# Altium PCB NB3000XN.PcbDoc (part 33 of 71)
Units mil, origin at the board's own origin, x right, y up, seen from the top; angles counter-clockwise.
Board outline 9527.56 x 6929.77 mil, 6 copper layers (Top Layer, GND+SHIELD, MidLayer1, MidLayer2, P2 - 3V3+5V0, Bottom Layer), stack 62.375 mil thick; 832 components, 1027 nets, 4655 pads, 4981 vias.
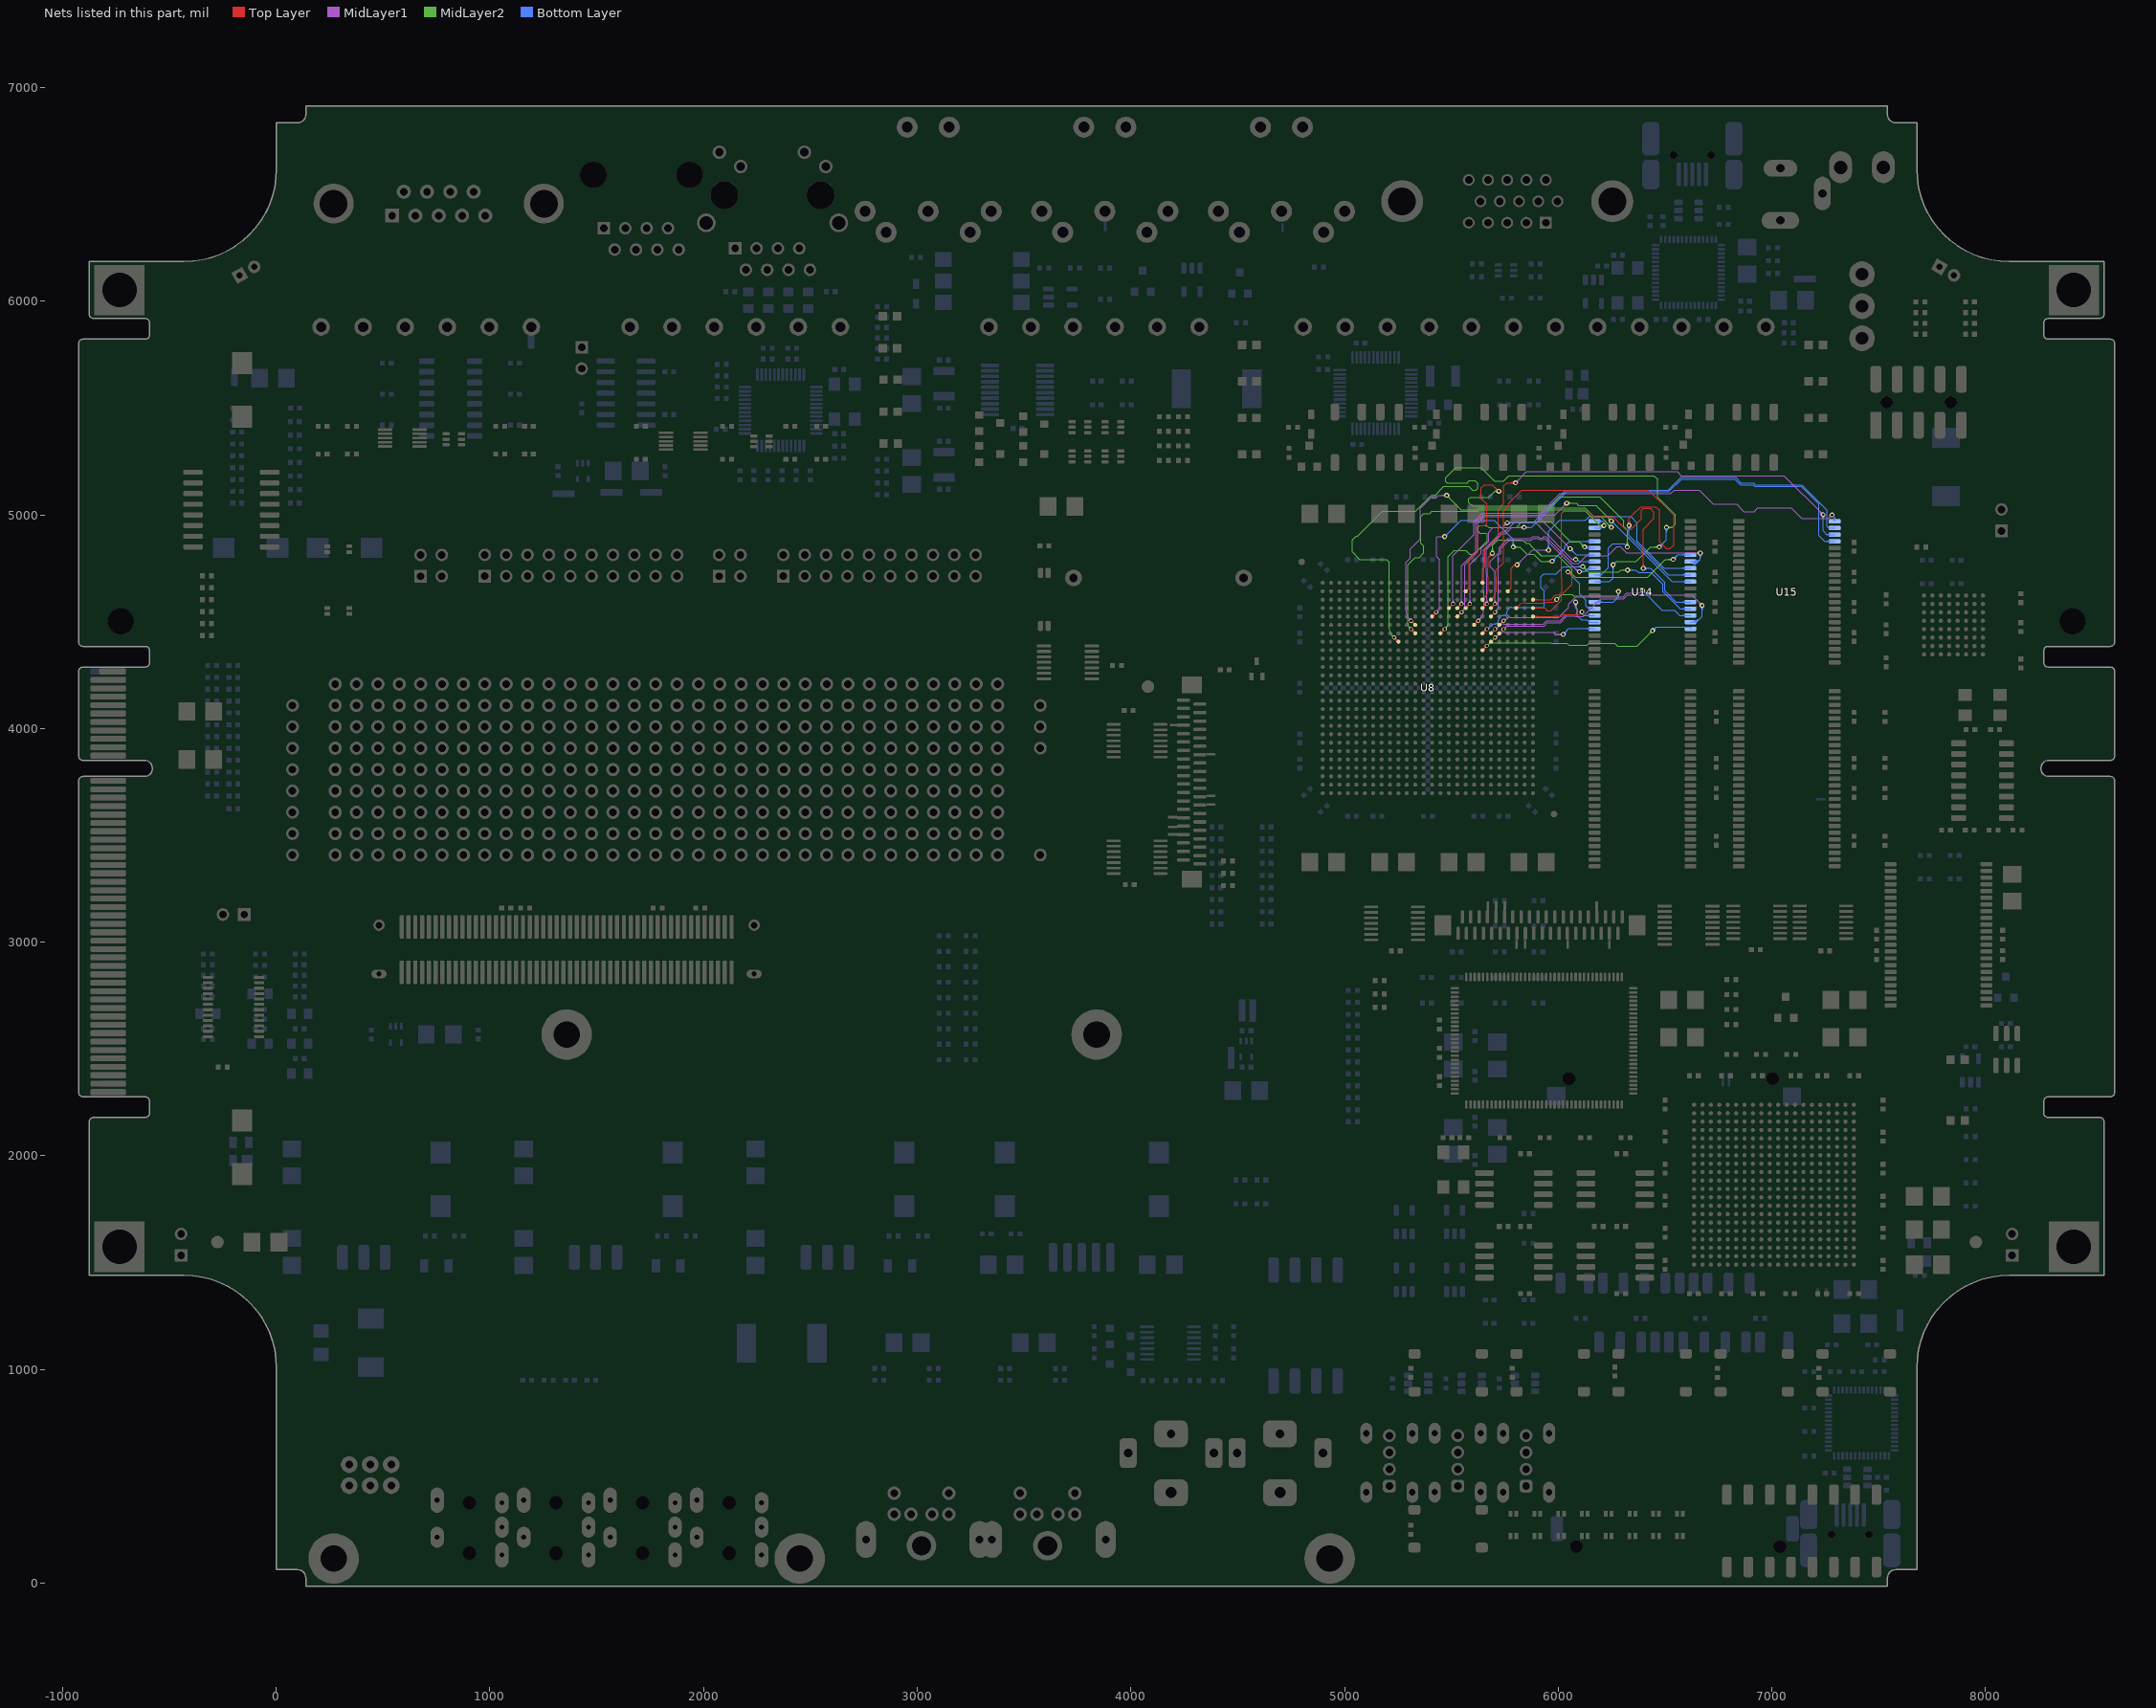
[diagram p37: the nets of this part, all layers, seen from the top]

## Via types
v1: diameter 23, hole 11.81, Top Layer to Bottom Layer, 3672 vias
v2: diameter 26, hole 11.81, Top Layer to Bottom Layer, 461 vias
v3: diameter 19, hole 11.81, Top Layer to Bottom Layer, tented both sides, 396 vias
v4: diameter 23.62, hole 11.81, Top Layer to Bottom Layer, 288 vias
v5: diameter 20, hole 11.81, Top Layer to Bottom Layer, 91 vias
v6: diameter 23, hole 11.81, Top Layer to Bottom Layer, tented both sides, 50 vias
v7: diameter 31, hole 11.81, Top Layer to Bottom Layer, 15 vias
v8: diameter 27.56, hole 11.81, Top Layer to Bottom Layer, tented both sides, 4 vias
v9: diameter 29, hole 11.81, Top Layer to Bottom Layer, 3 vias
v10: diameter 21, hole 11.81, Top Layer to Bottom Layer, 1 vias

## Nets (pads, with @x,y where several pads share a name; then routed paths per layer and width w, separated by ;. In a path a pad name is that pad's centre, name@x,y a point inside that pad or via, vN(x,y) a via of type N, cw(c..) or ccw(c..) an arc to the next point about the centre after c; other vN are vias at no path point) (continued)
DB_SRAM1.A16: U8.G12 U14.43 | length 1799.9
  Top Layer w4: v3(5311.26,4465.59) U8.G12@5330.94,4445.91 ; U8.G12@5323.44,4445.91 ccw(c5305.34,4445.91) 5318.14,4458.71 ccw(c5330.94,4471.51) U8.G12@5330.94,4453.41 ; U8.G12@5323.6,4445.91 ccw(c5305.88,4445.91) 5318.41,4458.44 ccw(c5330.94,4470.97) U8.G12@5330.94,4453.25 ; 5324.06,4452.79 cw(c5336.87,4465.59) 5318.76,4465.59 ccw(c5336.87,4465.59) 5324.06,4452.79 ; 5324.06,4452.79 ccw(c5311.26,4439.98) 5311.26,4458.09 cw(c5311.26,4439.98) 5324.06,4452.79
  MidLayer2 w4: 5295.75,4503.03 5295.75,4489.1 ; 5295.75,4699.16 5295.75,4640.9 ; 5299.87,4479.17 cw(c5309.8,4489.1) 5295.75,4489.1 ; v3@5303.79,4466.24 ccw(c5285.75,4467.82) 5299.62,4479.46 ccw(c5313.49,4491.1) v3@5311.91,4473.06 ; v1@6206.51,4944.45 ccw(c6195.52,4936.45) 6195.52,4950.04 ; v1@6206.51,4955.63 cw(c6195.52,4963.63) 6195.52,4950.04 ; v1(6214.19,4950.04) 6195.52,4950.04 ; 5295.75,4489.1 5295.75,4582.64 5295.75,4640.9 ; 5295.75,4640.9 5295.75,4710 5295.75,4720 5295.75,4766.97 5330,4801.22 5350.04,4801.22 5370.52,4821.71 5370.52,4854.37 5356.86,4868.04 5356.86,4993.04 5370.19,5006.37 5399.19,5006.37 5409.52,5016.71 5625.29,5016.71 5632.78,5024.2 6121.36,5024.2 6195.52,4950.04
  Bottom Layer w4: U14.43@6170.59,4939.21 6203.36,4939.21 ; U14.43@6194.74,4934.68 cw(c6203.36,4928.75) 6203.36,4939.21 ; U14.43@6194.74,4943.74 ccw(c6203.36,4949.67) 6203.36,4939.21 ; v1(6214.19,4950.04) 6203.36,4939.21
DB_SRAM1.A17: U8.F12 U14.44 | length 2061.9
  Top Layer w4: v3(5311.26,4504.96) U8.F12@5330.94,4485.28 ; U8.F12@5323.44,4485.28 ccw(c5305.34,4485.28) 5318.14,4498.08 ccw(c5330.94,4510.88) U8.F12@5330.94,4492.78 ; U8.F12@5323.6,4485.28 ccw(c5305.88,4485.28) 5318.41,4497.81 ccw(c5330.94,4510.34) U8.F12@5330.94,4492.62 ; 5324.06,4492.16 cw(c5336.87,4504.96) 5318.76,4504.96 ccw(c5336.87,4504.96) 5324.06,4492.16 ; 5324.06,4492.16 ccw(c5311.26,4479.35) 5311.26,4497.46 cw(c5311.26,4479.35) 5324.06,4492.16
  MidLayer1 w4: 5287.4,4581.77 5287.4,4567.84 ; v3@5303.79,4505.61 ccw(c5285.75,4507.19) 5299.62,4518.83 ; v3@5311.91,4512.43 cw(c5313.49,4530.47) 5299.62,4518.83 ; v1@5471.47,5084.99 ccw(c5455.26,5068.77) 5455.26,5091.71 ccw(c5455.26,5114.64) v1@5471.47,5098.43 ; v1@5474.3,5087.82 ccw(c5464.91,5078.43) 5464.91,5091.71 ccw(c5464.91,5104.99) v1@5474.3,5095.6 ; v1(5478.19,5091.71) 5438.33,5091.71 5430,5083.37 5406.52,5083.37 5354.86,5031.71 5354.86,4888.04 5306.86,4840.04 5306.86,4797.02 5287.4,4777.56 5287.4,4720 5287.4,4710 5287.4,4661.38 5287.4,4641.96 5287.4,4567.84 ; 5287.4,4567.84 5287.4,4548.34 ccw(c5329.13,4548.34) 5299.62,4518.83
  MidLayer2 w4: v1@5478.19,5082.21 cw(c5478.19,5059.27) 5494.41,5075.49 cw(c5510.63,5091.71) v1@5487.69,5091.71 ; v1@5478.19,5086.21 cw(c5478.19,5072.93) 5487.58,5082.32 cw(c5496.97,5091.71) v1@5483.69,5091.71 ; v1(5478.19,5091.71) 5544.86,5025.04 5622.31,5025.04 5629.47,5032.2 6124.69,5032.2 6165.19,4991.71 6198.52,4991.71 v1(6248.52,4941.71) ; v1@6239.02,4941.71 ccw(c6216.09,4941.71) 6232.31,4957.93 ccw(c6248.52,4974.14) v1@6248.52,4951.21 ; v1@6243.02,4941.71 ccw(c6229.75,4941.71) 6239.14,4951.1 ccw(c6248.52,4960.49) v1@6248.52,4947.21
  Bottom Layer w4: U14.44@6170.59,4970.71 6219.53,4970.71 v1(6248.52,4941.71) ; U14.44@6193.81,4965.05 cw(c6207.46,4951.4) 6207.46,4970.71 cw(c6207.47,4990.02) U14.44@6193.81,4976.36 ; v1@6239.02,4941.71 ccw(c6216.09,4941.71) 6232.31,4957.93 ccw(c6248.52,4974.14) v1@6248.52,4951.21 ; v1@6243.02,4941.71 ccw(c6229.75,4941.71) 6239.14,4951.1 ccw(c6248.52,4960.49) v1@6248.52,4947.21
DB_SRAM1.A18: U8.H21 U14.28 | length 811.3
  Top Layer w4: U8.H21@5685.28,4406.54 v3(5704.96,4426.22) ; U8.H21@5685.28,4413.88 ccw(c5685.28,4431.6) 5697.81,4419.07 ccw(c5710.34,4406.54) U8.H21@5692.62,4406.54 ; U8.H21@5685.28,4414.04 ccw(c5685.28,4432.14) 5698.08,4419.34 ccw(c5710.88,4406.54) U8.H21@5692.78,4406.54 ; 5692.16,4413.42 cw(c5704.96,4400.61) 5704.96,4418.72 ccw(c5704.96,4400.61) 5692.16,4413.42 ; 5692.16,4413.42 ccw(c5679.35,4426.22) 5697.46,4426.22 cw(c5679.35,4426.22) 5692.16,4413.42
  MidLayer1 w4: v3@5705.61,4433.69 ccw(c5707.19,4451.73) 5718.83,4437.86 ; v3@5712.43,4425.57 cw(c5730.47,4423.99) 5718.83,4437.86 ; 5781.77,4450.08 5767.84,4450.08 ; 5923.52,4450.04 5980,4450.04 5989.33,4440.71 v1(6023.52,4440.71) ; 5923.52,4450.08 5924.74,4450.08 5920,4450.08 5910,4450.08 5861.38,4450.08 5841.96,4450.08 5767.84,4450.08 ; v1@6016.81,4433.99 ccw(c6000.59,4417.77) 6000.59,4440.71 ccw(c6000.59,4463.64) v1@6016.81,4447.43 ; v1@6019.64,4436.82 ccw(c6010.25,4427.43) 6010.25,4440.71 ccw(c6010.25,4453.99) v1@6019.64,4444.6 ; 5718.83,4437.86 cw(c5748.34,4408.35) 5748.34,4450.08 5767.84,4450.08
  Bottom Layer w4: v1(6023.52,4440.71) 6023.52,4441.71 6049.52,4467.71 6164.52,4467.71 6165.19,4467.04 6165.19,4466.77 U14.28@6170.59,4466.77 ; v1@6023.52,4446.21 ccw(c6023.52,4457.07) 6031.21,4449.39 ; v1@6023.52,4450.21 ccw(c6023.52,4470.73) 6038.03,4456.22 ; v1@6029.02,4440.71 cw(c6044.72,4440.71) 6033.62,4451.8 ; v1@6033.02,4440.71 cw(c6058.37,4440.71) 6040.45,4458.63 ; 6131.46,4467.71 cw(c6131.46,4445.19) U14.28@6147.37,4461.11 ; 6135.98,4467.71 ccw(c6135.98,4483.82) U14.28@6147.37,4472.43 ; 6141.11,4467.71 cw(c6141.11,4454.85) U14.28@6150.2,4463.94
DB_SRAM1.D0: U8.D21 U14.7 | length 1913.9
  Top Layer w4: U8.D21@5685.28,4564.02 v3(5704.96,4583.7) ; U8.D21@5685.28,4571.36 ccw(c5685.28,4589.08) 5697.81,4576.55 ccw(c5710.34,4564.02) U8.D21@5692.62,4564.02 ; U8.D21@5685.28,4571.52 ccw(c5685.28,4589.62) 5698.08,4576.82 ccw(c5710.88,4564.02) U8.D21@5692.78,4564.02 ; 5692.16,4570.9 cw(c5704.96,4558.09) 5704.96,4576.2 ccw(c5704.96,4558.09) 5692.16,4570.9 ; 5692.16,4570.9 ccw(c5679.35,4583.7) 5697.46,4583.7 cw(c5679.35,4583.7) 5692.16,4570.9
  MidLayer1 w4: v3@5699.77,4588.89 ccw(c5687.23,4601.43) 5704.96,4601.43 ccw(c5722.69,4601.43) v3@5710.15,4588.89 ; v3(5704.96,4583.7) 5704.96,4661.38 5704.96,4710 5704.96,4720 5704.96,4733.27 5680.86,4757.37 5680.86,4782.37 5723.52,4825.04 5723.52,4847.04 5765.19,4888.71 5872.19,4888.71 5881.86,4898.37 5906.88,4898.37 5912.75,4892.5 5927.25,4892.5 5933.12,4898.37 5941.86,4898.37 6066.19,4774.04 6096.86,4774.04 6131.19,4808.37 6231.86,4808.37 6274.36,4850.87 6290.36,4850.87 6319.52,4821.71 v1(6665.19,4821.71) ; v1@6658.47,4814.99 ccw(c6642.26,4798.77) 6642.26,4821.71 ccw(c6642.26,4844.64) v1@6658.47,4828.43 ; v1@6661.3,4817.82 ccw(c6651.91,4808.43) 6651.91,4821.71 ccw(c6651.91,4834.99) v1@6661.3,4825.6 ; 5704.96,4601.81 cw(c5686.85,4601.81) 5699.66,4589 ccw(c5686.85,4601.81) 5704.96,4601.81 ; 5704.96,4601.81 ccw(c5723.07,4601.81) 5710.26,4589 cw(c5723.07,4601.81) 5704.96,4601.81
  Bottom Layer w4: U14.7@6619.41,4781.73 U14.7@6636.96,4781.73 ; 6630.88,4771.39 ccw(c6637.58,4782.77) 6646.92,4773.43 ; U14.7@6632.91,4774.84 ccw(c6640.29,4787.37) 6650.57,4777.09 ; U14.7@6634.94,4778.28 ccw(c6642.99,4791.97) 6654.23,4780.74 ; U14.7@6639,4785.18 ccw(c6648.41,4801.18) 6661.54,4788.05 ; U14.7@6641.02,4788.63 ccw(c6651.12,4805.78) 6665.19,4791.71 ; 6657.88,4784.4 cw(c6645.7,4796.58) U14.7@6636.97,4781.73 ; v1@6658.47,4814.99 cw(c6642.26,4798.77) 6665.19,4798.77 cw(c6688.13,4798.77) v1@6671.91,4814.99 ; v1@6661.3,4817.82 cw(c6651.91,4808.43) 6665.19,4808.43 cw(c6678.47,4808.43) v1@6669.08,4817.82 ; v1(6665.19,4821.71) 6665.19,4791.71 ; U14.7@6636.96,4781.73 6636.96,4775.04 6648.52,4775.04 6665.19,4791.71
DB_SRAM1.D1: U8.B23 U14.8 | length 1596.8
  Top Layer w4: 5780.47,4750.47 cw(c5806.45,4724.49) v1@5807.67,4761.21 ; 5786.99,4756.99 cw(c5806.87,4737.11) v1@5807.81,4765.21 ; 5793.51,4763.51 cw(c5807.29,4749.72) v1@5807.94,4769.21 ; v1(5807.86,4766.71) 5796.71,4766.71 5779.52,4749.52 5779.52,4720 5779.52,4710 5779.52,4662.47 ; 5776.55,4655.29 ccw(c5769.37,4662.47) 5779.52,4662.47 ; 5776.55,4655.29 ccw(c5769.37,4662.47) 5779.52,4662.47 ; 5776.55,4655.29 cw(c5764.02,4667.83) 5764.02,4650.1 ccw(c5764.02,4667.83) 5776.55,4655.29 ; 5776.55,4655.29 ccw(c5789.08,4642.76) 5771.36,4642.76 cw(c5789.08,4642.76) 5776.55,4655.29
  MidLayer1 w4: v1(5807.86,4766.71) 5856.15,4815 5860,4815 5880,4835 v1(5955,4835) 5955,4835.23 v1@5948.52,4841.71 ; v1@5807.86,4772.21 ccw(c5807.86,4785.49) 5817.25,4776.1 ccw(c5826.64,4766.71) v1@5813.36,4766.71 ; v1@5807.86,4776.21 ccw(c5807.86,4799.14) 5824.07,4782.93 ccw(c5840.29,4766.71) v1@5817.36,4766.71 ; v1@5948.28,4828.28 ccw(c5932.06,4812.06) 5932.06,4835 ccw(c5932.06,4857.93) v1@5948.28,4841.72 ; v1@5951.11,4831.11 ccw(c5941.72,4821.72) 5941.72,4835 ccw(c5941.72,4848.28) v1@5951.11,4838.89
  Bottom Layer w4: v1@5948.28,4841.72 ccw(c5932.06,4857.93) 5955,4857.93 ccw(c5977.93,4857.93) v1@5961.72,4841.72 ; v1@5948.52,4841.48 v1(5955,4835) 5955,4923.18 5996.38,4964.57 ; v1@5951.11,4838.89 ccw(c5941.72,4848.28) 5955,4848.28 ccw(c5968.28,4848.28) v1@5958.89,4838.89 ; 6001.11,4969.29 5996.38,4964.57 ; 6340.52,4991.71 6340,4991.71 ; 6506.52,4750.37 6506.52,4750.23 ; U14.8@6596.19,4744.58 ccw(c6582.54,4730.92) 6582.54,4750.23 ccw(c6582.54,4769.55) U14.8@6596.19,4755.89 ; U14.8@6619.41,4750.23 6506.52,4750.23 ; 5996.38,4964.57 6006.86,4975.04 6128.19,4975.04 6144.86,4991.71 6340,4991.71 ; 6340,4991.71 6370,4961.71 6370,4875.91 6495.67,4750.23 6506.52,4750.23
DB_SRAM1.D2: U8.C21 U14.9 | length 2701.3
  Top Layer w4: 5743.52,4821.71 5743.52,4822 ; v1@6325.14,4957.09 ccw(c6308.92,4973.31) 6331.86,4973.31 ccw(c6354.79,4973.31) v1@6338.57,4957.09 ; v1@6327.97,4954.26 ccw(c6318.58,4963.65) 6331.86,4963.65 ccw(c6345.14,4963.65) v1@6335.75,4954.26 ; v1(6331.86,4950.37) 6331.86,4983.37 6354.52,5006.04 6386.52,5038.04 6456.86,5038.04 6473.52,5021.37 6473.52,4875.04 6506.86,4841.71 6524.86,4841.71 6541.52,4858.37 6541.52,4998.71 6423.52,5116.71 5829.86,5116.71 5769,5055.85 5769,5042.24 5743.52,5016.77 5743.52,4822 ; 5697.81,4615.92 ccw(c5670.46,4643.27) 5709.14,4643.27 ; 5697.81,4615.92 ccw(c5670.46,4643.27) 5709.14,4643.27 ; 5697.81,4615.92 ccw(c5710.34,4603.39) 5692.62,4603.39 cw(c5710.34,4603.39) 5697.81,4615.92 ; 5697.81,4615.92 cw(c5685.28,4628.45) 5685.28,4610.73 ccw(c5685.28,4628.45) 5697.81,4615.92 ; 5709.14,4643.27 5709.14,4710 5709.14,4720 5709.14,4724.74 5709.14,4741.01 5743.52,4775.39 5743.52,4822
  Bottom Layer w4: v1@6325.14,4943.66 cw(c6308.92,4927.44) 6331.86,4927.44 cw(c6354.79,4927.44) v1@6338.57,4943.66 ; v1@6327.97,4946.49 cw(c6318.58,4937.1) 6331.86,4937.1 cw(c6345.14,4937.1) v1@6335.75,4946.49 ; v1(6331.86,4950.37) 6331.86,4902.74 6475.23,4759.36 6515.86,4718.74 ; 6493.52,4741.07 6515.86,4718.74 ; 6515.86,4718.74 U14.9@6619.41,4718.74 6515.86,4718.74 ; 6582.54,4718.74 cw(c6582.54,4699.42) 6596.19,4713.08 ccw(c6582.54,4699.42) 6582.54,4718.74 ; 6582.54,4718.74 ccw(c6582.54,4738.05) 6596.19,4724.4 cw(c6582.54,4738.05) 6582.54,4718.74
DB_SRAM1.D3: U8.D17 U14.10 | length 2087.1
  Top Layer w4: U8.D17@5527.8,4564.02 v3(5547.48,4583.7) ; U8.D17@5527.8,4571.36 ccw(c5527.8,4589.08) 5540.33,4576.55 ccw(c5552.86,4564.02) U8.D17@5535.14,4564.02 ; U8.D17@5527.8,4571.52 ccw(c5527.8,4589.62) 5540.6,4576.82 ccw(c5553.4,4564.02) U8.D17@5535.3,4564.02 ; 5534.68,4570.9 cw(c5547.48,4558.09) 5547.48,4576.2 ccw(c5547.48,4558.09) 5534.68,4570.9 ; 5534.68,4570.9 ccw(c5521.87,4583.7) 5539.98,4583.7 cw(c5521.87,4583.7) 5534.68,4570.9
  MidLayer1 w4: v3@5542.29,4588.89 ccw(c5529.75,4601.43) 5547.48,4601.43 ccw(c5565.21,4601.43) v3@5552.67,4588.89 ; v3(5547.48,4583.7) 5547.48,4661.38 5547.48,4710 5547.48,4720 5547.48,4724.74 5547.48,4752.37 5547.48,4762.46 5615.02,4830 5615.02,4965.33 5649.74,5000.04 5985.04,5000.04 v1(6040,5055) ; v1@6030.5,5055 cw(c6007.56,5055) 6023.78,5038.78 cw(c6040,5022.56) v1@6040,5045.5 ; v1@6034.5,5055 cw(c6021.22,5055) 6030.61,5045.61 cw(c6040,5036.22) v1@6040,5049.5 ; 5547.48,4601.81 cw(c5529.37,4601.81) 5542.18,4589 ccw(c5529.37,4601.81) 5547.48,4601.81 ; 5547.48,4601.81 ccw(c5565.59,4601.81) 5552.78,4589 cw(c5565.59,4601.81) 5547.48,4601.81
  MidLayer2 w4: v1(6040,5055) 6084.37,5055 6095,5044.37 6175.86,5044.37 v1(6248.52,4971.71) ; v1@6043.89,5051.11 cw(c6053.28,5041.72) 6053.28,5055 cw(c6053.28,5068.28) v1@6043.89,5058.89 ; v1@6046.72,5048.28 cw(c6062.93,5032.06) 6062.93,5055 cw(c6062.93,5077.93) v1@6046.72,5061.72 ; v1@6239.02,4971.71 ccw(c6216.09,4971.71) 6232.31,4987.93 ccw(c6248.52,5004.14) v1@6248.52,4981.21 ; v1@6243.02,4971.71 ccw(c6229.75,4971.71) 6239.14,4981.1 ccw(c6248.52,4990.49) v1@6248.52,4977.21
  Bottom Layer w4: v1@6248.52,4962.21 cw(c6248.52,4939.27) 6264.74,4955.49 cw(c6280.96,4971.71) v1@6258.02,4971.71 ; v1@6248.52,4966.21 cw(c6248.52,4952.93) 6257.91,4962.32 cw(c6267.3,4971.71) v1@6254.02,4971.71 ; v1(6248.52,4971.71) 6465.19,4755.04 6532.99,4687.24 U14.10@6619.41,4687.24 ; U14.10@6596.19,4681.59 ccw(c6582.54,4667.93) 6582.54,4687.24 ccw(c6582.54,4706.56) U14.10@6596.19,4692.9
DB_SRAM1.D4: U8.C26 U14.13 | length 1855
  Top Layer w4: U8.C26@5882.13,4603.39 5910,4603.39 5920,4603.39 5924.74,4603.39 5965.87,4603.39 5987.52,4625.04 6003.19,4625.04 6018.19,4640.04 6018.19,4700.04 6015.19,4703.04 6015.19,5005.19 6027.04,5017.04 6139.67,5017.04 6165,4991.71 6255.52,4991.71 6315.19,4932.04 6340.19,4932.04 6390.19,4982.04 6390.19,5021.71 6398.52,5030.04 6431.86,5030.04 6448.52,5013.37 6448.52,4983.37 6398.52,4933.37 v1(6398.52,4750.04) ; U8.C26@5887.32,4598.19 cw(c5899.85,4585.66) 5899.85,4603.39 cw(c5899.85,4621.11) U8.C26@5887.32,4608.58 ; U8.C26@5887.43,4598.08 cw(c5900.23,4585.28) 5900.23,4603.39 cw(c5900.23,4621.49) U8.C26@5887.43,4608.69 ; v1@6391.81,4756.76 ccw(c6375.59,4772.98) 6398.52,4772.98 ccw(c6421.46,4772.98) v1@6405.24,4756.76 ; v1@6394.64,4753.93 ccw(c6385.25,4763.32) 6398.52,4763.32 ccw(c6411.8,4763.32) v1@6402.41,4753.93
  Bottom Layer w4: v1(6398.52,4750.04) 6431.86,4750.04 6498.52,4683.37 6498.52,4644.69 6550.46,4592.75 U14.13@6619.41,4592.75 ; v1@6402.41,4746.15 cw(c6411.8,4736.76) 6411.8,4750.04 cw(c6411.8,4763.32) v1@6402.41,4753.93 ; v1@6405.24,4743.32 cw(c6421.46,4727.11) 6421.46,4750.04 cw(c6421.46,4772.98) v1@6405.24,4756.76 ; U14.13@6596.19,4587.1 ccw(c6582.54,4573.44) 6582.54,4592.75 ccw(c6582.54,4612.07) U14.13@6596.19,4598.41
DB_SRAM1.D5: U8.G20 U14.14 | length 1710.9
  Top Layer w4: U8.G20@5645.91,4445.91 v3(5665.59,4465.59) ; U8.G20@5645.91,4453.25 ccw(c5645.91,4470.97) 5658.44,4458.44 ccw(c5670.97,4445.91) U8.G20@5653.25,4445.91 ; U8.G20@5645.91,4453.41 ccw(c5645.91,4471.51) 5658.71,4458.71 ccw(c5671.51,4445.91) U8.G20@5653.41,4445.91 ; 5652.79,4452.79 cw(c5665.59,4439.98) 5665.59,4458.09 ccw(c5665.59,4439.98) 5652.79,4452.79 ; 5652.79,4452.79 ccw(c5639.98,4465.59) 5658.09,4465.59 cw(c5639.98,4465.59) 5652.79,4452.79
  MidLayer2 w4: v1@6115.19,4748.87 cw(c6115.19,4725.94) 6131.41,4742.16 cw(c6147.63,4758.37) v1@6124.69,4758.37 ; v1@6115.19,4752.87 cw(c6115.19,4739.6) 6124.58,4748.99 cw(c6133.97,4758.37) v1@6120.69,4758.37 ; v1(6115.19,4758.37) 6140.19,4733.37 6285,4733.37 6293.33,4741.71 v1(6325.19,4741.71) ; v1@6318.47,4734.99 ccw(c6302.26,4718.77) 6302.26,4741.71 ccw(c6302.26,4764.64) v1@6318.47,4748.43 ; v1@6321.3,4737.82 ccw(c6311.91,4728.43) 6311.91,4741.71 ccw(c6311.91,4754.99) v1@6321.3,4745.6
  Bottom Layer w4: v3@5666.89,4472.98 ccw(c5670.04,4490.81) 5680.42,4475.98 ; v3@5672.98,4464.29 cw(c5690.81,4461.14) 5680.42,4475.98 ; 5920,4658.43 5922.22,4656.22 ; v1@6108.47,4751.66 ccw(c6092.26,4735.44) 6092.26,4758.37 ccw(c6092.26,4781.31) v1@6108.47,4765.09 ; v1@6111.3,4754.49 ccw(c6101.91,4745.1) 6101.91,4758.37 ccw(c6101.91,4771.65) v1@6111.3,4762.26 ; v1(6115.19,4758.37) 6023.52,4758.37 5990.19,4725.04 5932.19,4725.04 5918.48,4711.33 5918.48,4659.96 5922.22,4656.22 ; v1(6325.19,4741.71) 6363.29,4741.71 6375,4730 6435.23,4730 6456.52,4708.71 6490.19,4675.04 6490.19,4641.71 6570.64,4561.26 U14.14@6619.41,4561.26 ; v1@6329.08,4737.82 cw(c6338.47,4728.43) 6338.47,4741.71 cw(c6338.47,4754.99) v1@6329.08,4745.6 ; v1@6331.91,4734.99 cw(c6348.13,4718.77) 6348.13,4741.71 cw(c6348.13,4764.64) v1@6331.91,4748.43 ; U14.14@6596.19,4555.6 ccw(c6582.54,4541.94) 6582.54,4561.26 ccw(c6582.54,4580.57) U14.14@6596.19,4566.92 ; 5680.42,4475.98 5688.15,4482.4 cw(c5704.96,4465.59) 5704.96,4489.36 ccw(c5704.96,4504.96) 5720.56,4504.96 cw(c5744.33,4504.96) 5744.33,4528.73 ccw(c5744.33,4544.33) 5759.93,4544.33 cw(c5783.7,4544.33) 5783.7,4568.1 5841.96,4568.1 5900.22,4568.1 5910,4568.1 5920,4568.1 5924.74,4568.1 5931.86,4568.1 5935,4571.24 5935,4643.43 5922.22,4656.22
DB_SRAM1.D6: U8.F22 U14.15 | length 1228.3
  Top Layer w4: U8.F22@5724.65,4485.28 v3(5744.33,4504.96) ; U8.F22@5724.65,4492.62 ccw(c5724.65,4510.34) 5737.18,4497.81 ccw(c5749.71,4485.28) U8.F22@5731.99,4485.28 ; U8.F22@5724.65,4492.78 ccw(c5724.65,4510.88) 5737.45,4498.08 ccw(c5750.25,4485.28) U8.F22@5732.15,4485.28 ; 5731.53,4492.16 cw(c5744.33,4479.35) 5744.33,4497.46 ccw(c5744.33,4479.35) 5731.53,4492.16 ; 5731.53,4492.16 ccw(c5718.72,4504.96) 5736.83,4504.96 cw(c5718.72,4504.96) 5731.53,4492.16
  MidLayer1 w4: v3@5745.63,4512.35 ccw(c5748.78,4530.18) 5759.16,4515.35 ccw(c5769.55,4500.51) v3@5751.72,4503.66 ; 5759.19,4515.38 cw(c5776.84,4487.34) 5777.01,4520.47 5861.38,4520.47 5910,4520.47 ; 5910,4520.54 5920,4520.54 6001.75,4520.54 6040.63,4559.42 6041.23,4559.42 6048.52,4566.71 6048.52,4583.37 6081.86,4616.71 6303.88,4616.71 6320.88,4633.71 6382.19,4633.71 v1(6395.19,4646.71)
  Bottom Layer w4: v1@6395.19,4637.21 cw(c6395.19,4614.27) 6411.41,4630.49 cw(c6427.63,4646.71) v1@6404.69,4646.71 ; v1@6395.19,4641.21 cw(c6395.19,4627.93) 6404.58,4637.32 cw(c6413.97,4646.71) v1@6400.69,4646.71 ; v1(6395.19,4646.71) 6486.9,4555 6544.53,4555 6569.76,4529.76 U14.15@6619.41,4529.76 ; U14.15@6596.19,4524.11 ccw(c6582.54,4510.45) 6582.54,4529.76 ccw(c6582.54,4549.08) U14.15@6596.19,4535.42
DB_SRAM1.D7: U8.G22 U14.16 | length 1487.7
  Top Layer w4: U8.G22@5724.65,4445.91 v3(5744.33,4465.59) ; U8.G22@5724.65,4453.25 ccw(c5724.65,4470.97) 5737.18,4458.44 ccw(c5749.71,4445.91) U8.G22@5731.99,4445.91 ; U8.G22@5724.65,4453.41 ccw(c5724.65,4471.51) 5737.45,4458.71 ccw(c5750.25,4445.91) U8.G22@5732.15,4445.91 ; 5731.53,4452.79 cw(c5744.33,4439.98) 5744.33,4458.09 ccw(c5744.33,4439.98) 5731.53,4452.79 ; 5731.53,4452.79 ccw(c5718.72,4465.59) 5736.83,4465.59 cw(c5718.72,4465.59) 5731.53,4452.79
  MidLayer1 w4: v3@5744.98,4473.06 ccw(c5746.56,4491.1) 5758.2,4477.23 ccw(c5769.84,4463.36) v3@5751.8,4464.94 ; 5757.91,4476.99 cw(c5767.84,4467.05) 5767.84,4481.1 5861.38,4481.1 5933.83,4481.1 5949.28,4496.54 6011.69,4496.54 6041.19,4526.04 6079.21,4526.04 6080.04,4525.21 6115.36,4525.21 6198.52,4608.37 6306.86,4608.37 6324.19,4625.71 6623.86,4625.71 v1(6673.52,4576.04) ; v1@6664.02,4576.04 ccw(c6641.09,4576.04) 6657.31,4592.26 ccw(c6673.52,4608.48) v1@6673.52,4585.54 ; v1@6668.02,4576.04 ccw(c6654.75,4576.04) 6664.14,4585.43 ccw(c6673.52,4594.82) v1@6673.52,4581.54
  Bottom Layer w4: U14.16@6619.41,4498.27 6623.52,4498.27 6623.52,4500.04 6648.52,4500.04 ; U14.16@6636.97,4498.27 ccw(c6636.97,4521.88) 6653.67,4505.18 ; U14.16@6636.97,4502.27 ccw(c6636.97,4535.54) 6660.5,4512.01 ; U14.16@6636.97,4506.27 ccw(c6636.97,4549.2) 6667.32,4518.84 ; U14.16@6643.65,4502.67 ccw(c6648.52,4505.88) 6648.52,4500.04 ; U14.16@6644.86,4496.94 cw(c6648.52,4496.32) 6648.52,4500.04 ; v1@6666.81,4569.32 cw(c6650.59,4553.11) 6673.52,4553.11 cw(c6696.46,4553.11) v1@6680.24,4569.32 ; v1@6669.64,4572.15 cw(c6660.25,4562.76) 6673.52,4562.76 cw(c6686.8,4562.76) v1@6677.41,4572.15 ; v1(6673.52,4576.04) 6673.52,4525.04 6648.52,4500.04
DB_SRAM1.D8: U8.G21 U14.29 | length 1019
  Top Layer w4: U8.G21@5685.28,4445.91 v3(5704.96,4465.59) ; U8.G21@5685.28,4453.25 ccw(c5685.28,4470.97) 5697.81,4458.44 ccw(c5710.34,4445.91) U8.G21@5692.62,4445.91 ; U8.G21@5685.28,4453.41 ccw(c5685.28,4471.51) 5698.08,4458.71 ccw(c5710.88,4445.91) U8.G21@5692.78,4445.91 ; 5692.16,4452.79 cw(c5704.96,4439.98) 5704.96,4458.09 ccw(c5704.96,4439.98) 5692.16,4452.79 ; 5692.16,4452.79 ccw(c5679.35,4465.59) 5697.46,4465.59 cw(c5679.35,4465.59) 5692.16,4452.79
  MidLayer1 w4: v3@5706.26,4472.98 ccw(c5709.41,4490.81) 5719.79,4475.98 ; v3@5712.35,4464.29 cw(c5730.18,4461.14) 5719.79,4475.98 ; 5781.77,4489.45 5767.84,4489.45 ; v1(6081.86,4591.71) 6081.86,4568.33 6090.19,4560 6090.19,4541.71 6082.52,4534.04 6037.88,4534.04 6008.38,4504.54 5945.02,4504.54 5929.94,4489.45 5920,4489.45 5910,4489.45 5861.38,4489.45 5841.96,4489.45 5767.84,4489.45 ; 5719.79,4475.98 5728.37,4483.06 cw(c5744.59,4465.68) 5744.42,4489.45 ; 5744.42,4489.45 cw(c5744.59,4465.68) 5744.59,4489.45 ; 5744.42,4489.45 5744.59,4489.45 ; 5744.59,4489.45 5767.84,4489.45 ; 6081.86,4568.77 cw(c6104.79,4568.77) 6088.57,4584.99 ccw(c6104.79,4568.77) 6081.86,4568.77 ; 6081.86,4568.77 ccw(c6058.92,4568.77) 6075.14,4584.99 cw(c6058.92,4568.77) 6081.86,4568.77 ; 6081.86,4578.43 cw(c6095.14,4578.43) 6085.75,4587.82 ccw(c6095.14,4578.43) 6081.86,4578.43 ; 6081.86,4578.43 ccw(c6068.58,4578.43) 6077.97,4587.82 cw(c6068.58,4578.43) 6081.86,4578.43
  Bottom Layer w4: v1@6075.14,4584.99 cw(c6058.92,4568.77) 6081.86,4568.77 cw(c6104.79,4568.77) v1@6088.57,4584.99 ; v1@6077.97,4587.82 cw(c6068.58,4578.43) 6081.86,4578.43 cw(c6095.14,4578.43) v1@6085.75,4587.82 ; v1(6081.86,4591.71) 6081.86,4563.33 6090.19,4555 6090.19,4526.71 6108.52,4508.37 6135,4508.37 6145.11,4498.27 U14.29@6150,4498.27 ; 6138.96,4504.41 ccw(c6143.43,4508.88) U14.29@6147.66,4504.2 ; 6141.93,4501.44 ccw(c6146.25,4505.76) U14.29@6150.35,4501.23 ; U14.29@6167.89,4498.27 U14.29@6150,4498.27 ; U14.29@6188.27,4498.27 U14.29@6150,4498.27
DB_SRAM1.D9: U8.E26 U14.30 | length 407.5
  Top Layer w4: U8.E26@5882.13,4524.65 5910,4524.65 5920,4524.65 6015,4524.65 6023.73,4533.37 6098.52,4533.37 v1(6111.19,4546.04) ; U8.E26@5887.32,4519.45 cw(c5899.85,4506.92) 5899.85,4524.65 cw(c5899.85,4542.37) U8.E26@5887.32,4529.84 ; U8.E26@5887.43,4519.34 cw(c5900.23,4506.54) 5900.23,4524.65 cw(c5900.23,4542.75) U8.E26@5887.43,4529.95
  Bottom Layer w4: v1(6111.19,4546.04) 6102.86,4546.04 6103.25,4545.65 6103.25,4545.43 6106.91,4541.76 6118.91,4529.76 U14.30@6170.59,4529.76 ; U14.30@6147.37,4524.11 ccw(c6133.72,4510.45) 6133.72,4529.76 ccw(c6133.72,4549.08) U14.30@6147.37,4535.42
DB_SRAM1.D10: U8.D26 U14.31 | length 771
  Top Layer w4: U8.D26@5882.13,4564.02 5910,4564.02 5920,4564.02 5924.74,4564.02 5936.99,4564.02 5948.96,4552.04 5967.19,4552.04 6015.19,4600.04 6015.19,4625.04 6065.19,4675.04 6065.19,4713.71 v1(6045.52,4733.37) ; U8.D26@5887.32,4558.82 cw(c5899.85,4546.29) 5899.85,4564.02 cw(c5899.85,4581.74) U8.D26@5887.32,4569.21 ; U8.D26@5887.43,4558.71 cw(c5900.23,4545.91) 5900.23,4564.02 cw(c5900.23,4582.12) U8.D26@5887.43,4569.32 ; v1@6045.52,4723.87 cw(c6045.52,4700.94) 6061.74,4717.16 cw(c6077.96,4733.37) v1@6055.02,4733.37 ; v1@6045.52,4727.87 cw(c6045.52,4714.6) 6054.91,4723.99 cw(c6064.3,4733.37) v1@6051.02,4733.37
  Bottom Layer w4: v1@6045.52,4723.87 cw(c6045.52,4700.94) 6061.74,4717.16 cw(c6077.96,4733.37) v1@6055.02,4733.37 ; v1@6045.52,4727.87 cw(c6045.52,4714.6) 6054.91,4723.99 cw(c6064.3,4733.37) v1@6051.02,4733.37 ; v1(6045.52,4733.37) 6100.86,4678.04 6100.86,4629.14 6130,4600 6130,4575 6143.74,4561.26 U14.31@6170.59,4561.26 ; 6134.65,4570.35 ccw(c6143.3,4579.01) U14.31@6149.19,4568.27 ; 6138.42,4566.58 ccw(c6145.97,4574.14) U14.31@6151.11,4564.77 ; 6142.19,4562.81 ccw(c6148.65,4569.26) U14.31@6153.03,4561.26
DB_SRAM1.D11: U8.D24 U14.32 | length 881.1
  Top Layer w4: v1(5992.86,4604.04) 5980.52,4591.71 5944.19,4591.71 5940.36,4587.88 5924.74,4587.88 5920,4587.88 5910,4587.88 5843.27,4587.88 ; 5815.92,4576.55 cw(c5843.27,4549.2) 5843.27,4587.88 ; 5815.92,4576.55 cw(c5843.27,4549.2) 5843.27,4587.88 ; 5815.92,4576.55 cw(c5803.39,4589.08) 5803.39,4571.36 ccw(c5803.39,4589.08) 5815.92,4576.55 ; 5815.92,4576.55 ccw(c5828.45,4564.02) 5810.73,4564.02 cw(c5828.45,4564.02) 5815.92,4576.55
  MidLayer2 w4: v1(5992.86,4604.04) 6015.86,4627.04 6065.19,4627.04 6070.52,4621.71 6277.52,4621.71 6281.86,4626.04 v1(6281.86,4641.71) ; v1@5992.86,4609.54 ccw(c5992.86,4622.82) 6002.25,4613.43 ccw(c6011.64,4604.04) v1@5998.36,4604.04 ; v1@5992.86,4613.54 ccw(c5992.86,4636.48) 6009.07,4620.26 ccw(c6025.29,4604.04) v1@6002.36,4604.04
  Bottom Layer w4: U14.32@6170.59,4592.75 6230.9,4592.75 6257.75,4592.75 6281.86,4616.86 v1(6281.86,4641.71) ; U14.32@6193.81,4587.1 cw(c6207.46,4573.44) 6207.46,4592.75 cw(c6207.46,4612.07) U14.32@6193.81,4598.41 ; v1@6275.14,4634.99 cw(c6258.92,4618.77) 6281.86,4618.77 cw(c6304.79,4618.77) v1@6288.57,4634.99 ; v1@6277.97,4637.82 cw(c6268.58,4628.43) 6281.86,4628.43 cw(c6295.14,4628.43) v1@6285.75,4637.82
DB_SRAM1.D12: U8.H10 U14.35 | length 3952.9
  Top Layer w4: v3(5232.52,4426.22) U8.H10@5252.2,4406.54 ; U8.H10@5244.7,4406.54 ccw(c5226.6,4406.54) 5239.4,4419.34 ccw(c5252.2,4432.14) U8.H10@5252.2,4414.04 ; U8.H10@5244.86,4406.54 ccw(c5227.14,4406.54) 5239.67,4419.07 ccw(c5252.2,4431.6) U8.H10@5252.2,4413.88 ; 5245.32,4413.42 cw(c5258.13,4426.22) 5240.02,4426.22 ccw(c5258.13,4426.22) 5245.32,4413.42 ; 5245.32,4413.42 ccw(c5232.52,4400.61) 5232.52,4418.72 cw(c5232.52,4400.61) 5245.32,4413.42
  MidLayer2 w4: 5208.66,4699.16 5208.66,4640.9 ; v3@5225.05,4426.87 ccw(c5207.01,4428.45) 5220.88,4440.09 ; v3@5233.17,4433.69 cw(c5234.75,4451.73) 5220.88,4440.09 ; v1(6256.86,4766.71) 6273.52,4783.37 6365.19,4783.37 6431.86,4850.04 v1(6473.52,4850.04) ; v1@6256.86,4772.21 ccw(c6256.86,4785.49) 6266.25,4776.1 ccw(c6275.64,4766.71) v1@6262.36,4766.71 ; v1@6256.86,4776.21 ccw(c6256.86,4799.14) 6273.07,4782.93 ccw(c6289.29,4766.71) v1@6266.36,4766.71 ; v1@6466.81,4843.32 ccw(c6450.59,4827.11) 6450.59,4850.04 ccw(c6450.59,4872.98) v1@6466.81,4856.76 ; v1@6469.64,4846.15 ccw(c6460.25,4836.76) 6460.25,4850.04 ccw(c6460.25,4863.32) v1@6469.64,4853.93 ; v1(6506.86,4941.71) 6533.86,4941.71 6548.52,4956.37 6548.52,5000.04 6465.19,5083.37 6465.19,5166.71 6448.52,5183.37 5768.86,5183.37 5743.86,5158.37 5702.56,5158.37 5639.56,5221.37 5519.86,5221.37 5473.52,5175.04 5473.52,5157.37 5480.86,5150.04 5573.52,5150.04 5583.48,5160 5610,5160 5623.52,5146.48 5623.52,5125.04 5615.19,5116.71 5598.52,5116.71 5581.86,5133.37 5465.19,5133.37 5423.52,5091.71 5406.86,5091.71 5332.15,5017 5178.31,5017 5061.69,4900.37 5054.52,4900.37 5036.19,4882.04 5036.19,4826.44 5070.59,4792.04 5195.21,4792.04 5208.66,4778.59 5208.66,4720 5208.66,4710 5208.66,4640.9 ; v1@6510.75,4937.82 cw(c6520.14,4928.43) 6520.14,4941.71 cw(c6520.14,4954.99) v1@6510.75,4945.6 ; v1@6513.57,4934.99 cw(c6529.79,4918.77) 6529.79,4941.71 cw(c6529.79,4964.64) v1@6513.57,4948.43 ; 5208.66,4640.9 5208.66,4582.64 5208.66,4563.22 5208.66,4489.1 5208.66,4469.6 ccw(c5250.39,4469.6) 5220.88,4440.09
  Bottom Layer w4: U14.35@6193.81,4681.59 cw(c6207.46,4667.93) 6207.46,4687.24 cw(c6207.46,4706.56) U14.35@6193.81,4692.9 ; v1@6250.14,4759.99 cw(c6233.92,4743.77) 6256.86,4743.77 cw(c6279.79,4743.77) v1@6263.57,4759.99 ; v1@6252.97,4762.82 cw(c6243.58,4753.43) 6256.86,4753.43 cw(c6270.14,4753.43) v1@6260.75,4762.82 ; v1(6256.86,4766.71) 6256.86,4704.1 6240,4687.24 U14.35@6171.47,4687.24 ; v1(6473.52,4850.04) 6506.86,4883.37 v1(6506.86,4941.71) ; v1@6473.52,4855.54 ccw(c6473.52,4868.82) 6482.91,4859.43 ccw(c6492.3,4850.04) v1@6479.02,4850.04 ; v1@6473.52,4859.54 ccw(c6473.52,4882.48) 6489.74,4866.26 ccw(c6505.96,4850.04) v1@6483.02,4850.04 ; v1@6500.14,4934.99 cw(c6483.92,4918.77) 6506.86,4918.77 cw(c6529.79,4918.77) v1@6513.57,4934.99 ; v1@6502.97,4937.82 cw(c6493.58,4928.43) 6506.86,4928.43 cw(c6520.14,4928.43) v1@6510.75,4937.82 ; U14.35@6171.47,4687.24 U14.35@6170.59,4687.24 U14.35@6171.47,4687.24
DB_SRAM1.D13: U8.B18 U14.36 | length 2184.8
  Top Layer w4: U8.B18@5567.17,4650.1 ccw(c5567.17,4667.83) 5579.7,4655.29 ; U8.B18@5574.51,4642.76 cw(c5592.23,4642.76) 5579.7,4655.29 ; v1@5712.69,5110.71 ccw(c5689.76,5110.71) 5705.97,5126.93 ccw(c5722.19,5143.14) v1@5722.19,5120.21 ; v1@5716.69,5110.71 ccw(c5703.41,5110.71) 5712.8,5120.1 ccw(c5722.19,5129.49) v1@5722.19,5116.21 ; v1(5722.19,5110.71) 5691.19,5141.71 5655.19,5141.71 5640.19,5126.71 5640.19,5075.04 5665.19,5050.04 5665.19,4959.71 5656.86,4951.37 5627.52,4951.37 5623.52,4947.37 5623.52,4829.37 5582.67,4788.52 5582.67,4724.74 5582.67,4720 5582.67,4710 5582.67,4662.47 cw(c5572.52,4662.47) 5579.7,4655.29
  MidLayer2 w4: v1@5714.51,5105.12 ccw(c5703.52,5097.12) 5703.52,5110.71 ; v1@5714.51,5116.3 cw(c5703.52,5124.29) 5703.52,5110.71 ; v1(5722.19,5110.71) 5703.52,5110.71 ; v1@6316.81,4856.76 ccw(c6300.59,4872.98) 6323.52,4872.98 ccw(c6346.46,4872.98) v1@6330.24,4856.76 ; v1@6319.64,4853.93 ccw(c6310.25,4863.32) 6323.52,4863.32 ccw(c6336.8,4863.32) v1@6327.41,4853.93 ; v1(6323.52,4850.04) 6323.52,4928.04 6305.77,4945.8 6305.77,4973.15 6195.21,5083.71 6007.19,5083.71 5965.19,5041.71 5598.52,5041.71 5581.86,5058.37 5581.86,5075.04 5590.19,5083.37 5676.19,5083.37 5703.52,5110.71
  Bottom Layer w4: U14.36@6170.59,4718.74 6200.55,4718.74 ; U14.36@6195.44,4715.44 cw(c6200.55,4713.12) 6200.55,4718.74 ; U14.36@6195.44,4722.04 ccw(c6200.55,4724.36) 6200.55,4718.74 ; v1(6323.52,4850.04) 6308.56,4865 6255,4865 6235,4845 6235,4753.18 6231.86,4750.04 6200.55,4718.74
DB_SRAM1.D14: U8.E21 U14.37 | length 1194
  Top Layer w4: U8.E21@5685.28,4524.65 v3(5704.96,4544.33) ; U8.E21@5685.28,4531.99 ccw(c5685.28,4549.71) 5697.81,4537.18 ccw(c5710.34,4524.65) U8.E21@5692.62,4524.65 ; U8.E21@5685.28,4532.15 ccw(c5685.28,4550.25) 5698.08,4537.45 ccw(c5710.88,4524.65) U8.E21@5692.78,4524.65 ; 5692.16,4531.53 cw(c5704.96,4518.72) 5704.96,4536.83 ccw(c5704.96,4518.72) 5692.16,4531.53 ; 5692.16,4531.53 ccw(c5679.35,4544.33) 5697.46,4544.33 cw(c5679.35,4544.33) 5692.16,4531.53
  MidLayer1 w4: v3@5703.66,4551.72 ccw(c5700.51,4569.55) 5715.35,4559.16 ccw(c5730.18,4548.78) v3@5712.35,4545.63 ; 5715.38,4559.19 ccw(c5687.34,4576.84) 5720.47,4577.01 5720.47,4661.38 5720.47,4710 5720.47,4810.67 5732.35,4822.56 5732.35,4827.53 5731.52,4828.35 5731.52,4843.73 5768.5,4880.71 5875.5,4880.71 5885.17,4890.37 5903.56,4890.37 5909.44,4884.5 5930.56,4884.5 5936.44,4890.37 5937.19,4890.37 6094.19,4733.37 6098.52,4733.37 v1(6099.52,4734.37) ; 6072.49,4755.07 ccw(c6099.52,4782.1) v1@6099.52,4743.87 ; 6079.32,4748.24 ccw(c6099.52,4768.44) v1@6099.52,4739.87 ; 6086.15,4741.41 ccw(c6099.52,4754.79) v1@6099.52,4735.87 ; 6087.79,4739.78 cw(c6082.38,4734.37) v1@6090.02,4734.37
  Bottom Layer w4: v1(6099.52,4734.37) 6126.19,4734.37 6141.86,4750.04 6170.59,4750.04 6173.52,4750.04 6173.52,4750.23 U14.37@6170.59,4750.23 ; v1@6103.41,4730.49 cw(c6112.8,4721.1) 6112.8,4734.37 cw(c6112.8,4747.65) v1@6103.41,4738.26 ; v1@6106.24,4727.66 cw(c6122.46,4711.44) 6122.46,4734.37 cw(c6122.46,4757.31) v1@6106.24,4741.09 ; 6127.51,4735.7 cw(c6152.95,4710.25) U14.37@6153.02,4746.23 ; 6134.32,4742.51 cw(c6152.98,4723.85) U14.37@6153.03,4750.23 ; 6141.13,4749.32 cw(c6153.01,4737.44) U14.37@6153.04,4754.23
DB_SRAM1.D15: U8.F19 U14.38 | length 1237.1
  Top Layer w4: U8.F19@5606.54,4485.28 v3(5626.22,4504.96) ; U8.F19@5606.54,4492.62 ccw(c5606.54,4510.34) 5619.07,4497.81 ccw(c5631.6,4485.28) U8.F19@5613.88,4485.28 ; U8.F19@5606.54,4492.78 ccw(c5606.54,4510.88) 5619.34,4498.08 ccw(c5632.14,4485.28) U8.F19@5614.04,4485.28 ; 5613.42,4492.16 cw(c5626.22,4479.35) 5626.22,4497.46 ccw(c5626.22,4479.35) 5613.42,4492.16 ; 5613.42,4492.16 ccw(c5600.61,4504.96) 5618.72,4504.96 cw(c5600.61,4504.96) 5613.42,4492.16
  MidLayer1 w4: v3@5625.57,4512.43 ccw(c5623.99,4530.47) 5637.86,4518.83 ; v3@5633.69,4505.61 cw(c5651.73,4507.19) 5637.86,4518.83 ; 5650.08,4581.77 5650.08,4567.84 ; v1@6073.77,4786.73 ccw(c6064.86,4781.25) 6064.86,4791.71 ; v1@6073.77,4796.69 cw(c6064.86,4802.17) 6064.86,4791.71 ; v1(6081.86,4791.71) 6064.86,4791.71 ; 5637.86,4518.83 ccw(c5608.35,4548.34) 5650.08,4548.34 5650.08,4567.84 ; 5650.08,4567.84 5650.08,4641.96 5650.08,4661.38 5650.08,4710 5650.08,4720 5650.08,4724.74 5650.08,4835.93 5735.15,4921 5749.82,4921 5795.52,4966.71 5892.37,4966.71 5913.81,4945.26 5913.81,4942.75 6064.86,4791.71
  Bottom Layer w4: v1(6081.86,4791.71) 6089.52,4791.71 6099.5,4781.73 U14.38@6170.59,4781.73 ; v1@6082.29,4790.27 cw(c6085.65,4779.13) 6093.87,4787.36 ; v1@6083.44,4786.44 cw(c6087.83,4771.86) 6098.6,4782.63 ; U14.38@6147.37,4776.07 ccw(c6133.72,4762.42) 6133.72,4781.73 ccw(c6133.72,4801.04) U14.38@6147.37,4787.39
DB_SRAM1.NBHE: U8.G15 U14.40 | length 1673.3
  Top Layer w4: U8.G15@5449.06,4445.91 v3(5468.74,4465.59) ; U8.G15@5449.06,4453.25 ccw(c5449.06,4470.97) 5461.59,4458.44 ccw(c5474.12,4445.91) U8.G15@5456.4,4445.91 ; U8.G15@5449.06,4453.41 ccw(c5449.06,4471.51) 5461.86,4458.71 ccw(c5474.66,4445.91) U8.G15@5456.56,4445.91 ; 5455.94,4452.79 cw(c5468.74,4439.98) 5468.74,4458.09 ccw(c5468.74,4439.98) 5455.94,4452.79 ; 5455.94,4452.79 ccw(c5443.13,4465.59) 5461.24,4465.59 cw(c5443.13,4465.59) 5455.94,4452.79
  MidLayer2 w4: v3@5468.09,4473.06 ccw(c5466.51,4491.1) 5480.38,4479.46 ccw(c5494.25,4467.82) v3@5476.21,4466.24 ; 5480.13,4479.17 ccw(c5470.2,4489.1) 5484.25,4489.1 ; 5484.25,4503.03 5484.25,4489.1 ; 5484.25,4699.16 5484.25,4640.9 ; v1@6114.02,4850.04 ccw(c6091.09,4850.04) 6107.31,4866.26 ccw(c6123.52,4882.48) v1@6123.52,4859.54 ; v1@6118.02,4850.04 ccw(c6104.75,4850.04) 6114.14,4859.43 ccw(c6123.52,4868.82) v1@6123.52,4855.54 ; v1(6123.52,4850.04) 6098.52,4875.04 6059.19,4875.04 5967.02,4967.21 5829.63,4967.21 5804.13,4941.71 5674.67,4941.71 5665,4951.37 5633.52,4951.37 5623.52,4941.37 5623.52,4925.37 5633.52,4915.37 5664.52,4915.37 5668.52,4911.37 5668.52,4879.69 5605.54,4816.71 5585.19,4816.71 5568.52,4833.37 5513.52,4833.37 5484.25,4804.1 5484.25,4724.74 5484.25,4720 5484.25,4710 5484.25,4640.9 ; 5484.25,4489.1 5484.25,4582.64 5484.25,4640.9
  Bottom Layer w4: v1(6123.52,4850.04) 6128.84,4844.72 U14.40@6170.59,4844.72 ; v1@6124.58,4851.1 ccw(c6139.98,4866.5) 6139.98,4844.72 ; v1@6127.41,4853.93 ccw(c6149.64,4876.16) U14.40@6149.64,4844.72 ; v1@6130.24,4856.76 ccw(c6159.3,4885.81) U14.40@6159.3,4844.72 ; U14.40@6147.37,4839.07 ccw(c6133.72,4825.41) 6133.72,4844.72 ccw(c6133.72,4864.04) U14.40@6147.37,4850.38
DB_SRAM1.NBLE: U8.E17 U14.39 | length 1391.4
  Top Layer w4: U8.E17@5527.8,4524.65 v3(5547.48,4544.33) ; U8.E17@5527.8,4531.99 ccw(c5527.8,4549.71) 5540.33,4537.18 ccw(c5552.86,4524.65) U8.E17@5535.14,4524.65 ; U8.E17@5527.8,4532.15 ccw(c5527.8,4550.25) 5540.6,4537.45 ccw(c5553.4,4524.65) U8.E17@5535.3,4524.65 ; 5534.68,4531.53 cw(c5547.48,4518.72) 5547.48,4536.83 ccw(c5547.48,4518.72) 5534.68,4531.53 ; 5534.68,4531.53 ccw(c5521.87,4544.33) 5539.98,4544.33 cw(c5521.87,4544.33) 5534.68,4531.53
  MidLayer1 w4: v3@5546.83,4551.8 ccw(c5545.25,4569.84) 5559.12,4558.2 ccw(c5572.99,4546.56) v3@5554.95,4544.98 ; 5558.87,4557.91 ccw(c5548.94,4567.84) 5562.99,4567.84 ; 5562.99,4581.77 5562.99,4567.84 ; v1@6046.36,4841.71 ccw(c6023.42,4841.71) 6039.64,4857.93 ccw(c6055.86,4874.14) v1@6055.86,4851.21 ; v1@6050.36,4841.71 ccw(c6037.08,4841.71) 6046.47,4851.1 ccw(c6055.86,4860.49) v1@6055.86,4847.21 ; v1(6055.86,4841.71) 5905.86,4991.71 5652.72,4991.71 5623.02,4962.01 5623.02,4826.69 5562.99,4766.65 5562.99,4724.74 5562.99,4720 5562.99,4710 5562.99,4661.38 5562.99,4567.84
  Bottom Layer w4: v1@6055.86,4832.21 cw(c6055.86,4809.27) 6072.07,4825.49 cw(c6088.29,4841.71) v1@6065.36,4841.71 ; v1@6055.86,4836.21 cw(c6055.86,4822.93) 6065.25,4832.32 cw(c6074.64,4841.71) v1@6061.36,4841.71 ; v1(6055.86,4841.71) 6084.34,4813.23 U14.39@6170.59,4813.23 ; U14.39@6147.37,4807.57 ccw(c6133.72,4793.91) 6133.72,4813.23 ccw(c6133.72,4832.54) U14.39@6147.37,4818.88
DB_SRAM1.NCS: U8.C20 U14.6 | length 1745.1
  Top Layer w4: 5669.77,4724.74 5669.77,4725.04 ; v1@5682.69,4819.71 cw(c5659.76,4819.71) 5675.97,4803.49 cw(c5692.19,4787.27) v1@5692.19,4810.21 ; v1@5686.69,4819.71 cw(c5673.41,4819.71) 5682.8,4810.32 cw(c5692.19,4800.93) v1@5692.19,4814.21 ; v1(5692.19,4819.71) 5673.52,4801.04 5673.52,4769 5673.52,4752.93 5669.77,4749.17 5669.77,4746.65 5669.77,4738 5669.77,4720 5669.77,4710 5669.77,4643.27 ; 5658.44,4615.92 ccw(c5631.09,4643.27) 5669.77,4643.27 ; 5658.44,4615.92 ccw(c5631.09,4643.27) 5669.77,4643.27 ; 5658.44,4615.92 ccw(c5670.97,4603.39) 5653.25,4603.39 cw(c5670.97,4603.39) 5658.44,4615.92 ; 5658.44,4615.92 cw(c5645.91,4628.45) 5645.91,4610.73 ccw(c5645.91,4628.45) 5658.44,4615.92
  MidLayer2 w4: v1@5685.47,4826.43 ccw(c5669.26,4842.64) 5692.19,4842.64 ccw(c5715.13,4842.64) v1@5698.91,4826.43 ; v1@5688.3,4823.6 ccw(c5678.91,4832.99) 5692.19,4832.99 ccw(c5705.47,4832.99) v1@5696.08,4823.6 ; v1(5692.19,4819.71) 5692.19,4858.1 5717.47,4883.37 5832.23,4883.37 5848.9,4866.71 5863.48,4866.71 ; v1@6531.47,4784.99 ccw(c6515.26,4768.77) 6515.26,4791.71 ccw(c6515.26,4814.64) v1@6531.47,4798.43 ; v1@6534.3,4787.82 ccw(c6524.91,4778.43) 6524.91,4791.71 ccw(c6524.91,4804.99) v1@6534.3,4795.6 ; v1(6538.19,4791.71) 6501.86,4791.71 6418.52,4708.37 6081.19,4708.37 6065.19,4724.37 6065.19,4743.37 5999.19,4809.37 5920.81,4809.37 ; 5863.48,4866.71 5877.81,4852.38 ; 5863.48,4866.71 5877.81,4852.38 ; 5877.81,4852.38 5920.81,4809.37 ; 5877.81,4852.38 5877.81,4851.44 5919.88,4809.37 5920.81,4809.37
  Bottom Layer w4: v1(6538.19,4791.71) 6559.71,4813.23 U14.6@6619.41,4813.23 ; v1@6538.19,4797.21 ccw(c6538.19,4810.49) 6547.58,4801.1 ccw(c6556.97,4791.71) v1@6543.69,4791.71 ; v1@6538.19,4801.21 ccw(c6538.19,4824.14) 6554.41,4807.93 ccw(c6570.63,4791.71) v1@6547.69,4791.71 ; U14.6@6596.19,4807.57 ccw(c6582.54,4793.91) 6582.54,4813.23 ccw(c6582.54,4832.54) U14.6@6596.19,4818.88
DB_SRAM1.NOE: U8.E14 U14.41 | length 1760.3
  Top Layer w4: U8.E14@5409.69,4524.65 v3(5429.37,4544.33) ; U8.E14@5409.69,4531.99 ccw(c5409.69,4549.71) 5422.22,4537.18 ccw(c5434.75,4524.65) U8.E14@5417.03,4524.65 ; U8.E14@5409.69,4532.15 ccw(c5409.69,4550.25) 5422.49,4537.45 ccw(c5435.29,4524.65) U8.E14@5417.19,4524.65 ; 5416.57,4531.53 cw(c5429.37,4518.72) 5429.37,4536.83 ccw(c5429.37,4518.72) 5416.57,4531.53 ; 5416.57,4531.53 ccw(c5403.76,4544.33) 5421.87,4544.33 cw(c5403.76,4544.33) 5416.57,4531.53
  MidLayer1 w4: v3@5428.72,4551.8 ccw(c5427.14,4569.84) 5441.01,4558.2 ccw(c5454.88,4546.56) v3@5436.84,4544.98 ; 5440.76,4557.91 ccw(c5430.83,4567.84) 5444.88,4567.84 ; 5444.88,4581.77 5444.88,4567.84 ; v1(5468.4,4898.5) 5433.5,4898.5 5431.86,4896.86 5431.86,4804.73 5444.88,4791.71 5444.88,4724.74 5444.88,4720 5444.88,4710 5444.88,4567.84
  MidLayer2 w4: v1(5789.86,4850.04) 5820.67,4850.04 5855,4815.71 5886.19,4815.71 5918.52,4783.37 v1(5971.86,4783.37) ; v1@5793.75,4846.15 cw(c5803.14,4836.76) 5803.14,4850.04 cw(c5803.14,4863.32) v1@5793.75,4853.93 ; v1@5796.57,4843.32 cw(c5812.79,4827.11) 5812.79,4850.04 cw(c5812.79,4872.98) v1@5796.57,4856.76 ; v1@5965.14,4776.66 ccw(c5948.92,4760.44) 5948.92,4783.37 ccw(c5948.92,4806.31) v1@5965.14,4790.09 ; v1@5967.97,4779.49 ccw(c5958.58,4770.1) 5958.58,4783.37 ccw(c5958.58,4796.65) v1@5967.97,4787.26
  Bottom Layer w4: v1(5468.4,4898.5) 5545.61,4975.71 5655,4975.71 5699.69,4975.71 5789.86,4885.54 v1(5789.86,4850.04) ; v1@5468.4,4904 ccw(c5468.4,4917.28) 5477.79,4907.89 ccw(c5487.18,4898.5) v1@5473.9,4898.5 ; v1@5468.4,4908 ccw(c5468.4,4930.94) 5484.62,4914.72 ccw(c5500.83,4898.5) v1@5477.9,4898.5 ; v1@5783.14,4856.76 ccw(c5766.92,4872.98) 5789.86,4872.98 ccw(c5812.79,4872.98) v1@5796.57,4856.76 ; v1@5785.97,4853.93 ccw(c5776.58,4863.32) 5789.86,4863.32 ccw(c5803.14,4863.32) v1@5793.75,4853.93 ; v1(5971.86,4783.37) 6031.86,4843.37 6031.86,4854.37 6053.7,4876.22 U14.41@6170.59,4876.22 ; v1@5971.86,4788.87 ccw(c5971.86,4802.15) 5981.25,4792.76 ccw(c5990.64,4783.37) v1@5977.36,4783.37 ; v1@5971.86,4792.87 ccw(c5971.86,4815.81) 5988.07,4799.59 ccw(c6004.29,4783.37) v1@5981.36,4783.37 ; U14.41@6147.37,4870.56 ccw(c6133.72,4856.9) 6133.72,4876.22 ccw(c6133.72,4895.53) U14.41@6147.37,4881.88
DB_SRAM1.NWE: U8.J20 U14.17 | length 1294.7
  Top Layer w4: U8.J20@5645.91,4367.17 v3(5665.59,4386.85) ; U8.J20@5645.91,4374.51 ccw(c5645.91,4392.23) 5658.44,4379.7 ccw(c5670.97,4367.17) U8.J20@5653.25,4367.17 ; U8.J20@5645.91,4374.67 ccw(c5645.91,4392.77) 5658.71,4379.97 ccw(c5671.51,4367.17) U8.J20@5653.41,4367.17 ; 5652.79,4374.05 cw(c5665.59,4361.24) 5665.59,4379.35 ccw(c5665.59,4361.24) 5652.79,4374.05 ; 5652.79,4374.05 ccw(c5639.98,4386.85) 5658.09,4386.85 cw(c5639.98,4386.85) 5652.79,4374.05
  MidLayer2 w4: v3@5666.24,4394.32 ccw(c5667.82,4412.36) 5679.46,4398.49 ccw(c5691.1,4384.62) v3@5673.06,4386.2 ; 5679.17,4398.24 cw(c5689.1,4388.31) 5689.1,4402.36 5782.64,4402.36 5910,4402.36 5920,4402.36 5966.58,4402.36 5968.9,4400.04 6040.19,4400.04 6050.86,4389.37 6123.52,4389.37 6134.88,4389.37 6145.54,4400.04 6263.17,4400.04 6276.84,4386.37 6369.86,4386.37 v1(6441.86,4458.37) ; v1@6432.36,4458.37 cw(c6409.42,4458.37) 6425.64,4442.16 cw(c6441.86,4425.94) v1@6441.86,4448.87 ; v1@6436.36,4458.37 cw(c6423.08,4458.37) 6432.47,4448.99 cw(c6441.86,4439.6) v1@6441.86,4452.87
  Bottom Layer w4: v1(6441.86,4458.37) 6459.52,4476.04 6619.41,4476.04 6623.52,4476.04 6623.52,4466.77 U14.17@6619.41,4466.77 ; v1@6441.86,4463.87 ccw(c6441.86,4477.15) 6451.25,4467.76 ccw(c6460.64,4458.37) v1@6447.36,4458.37 ; v1@6441.86,4467.87 ccw(c6441.86,4490.81) 6458.08,4474.59 ccw(c6474.29,4458.37) v1@6451.36,4458.37
DB_SRAM2.A0: U8.D16 U15.1 | length 2551.1
  Top Layer w4: U8.D16@5488.43,4564.02 v3(5508.11,4583.7) ; U8.D16@5488.43,4571.36 ccw(c5488.43,4589.08) 5500.96,4576.55 ccw(c5513.49,4564.02) U8.D16@5495.77,4564.02 ; U8.D16@5488.43,4571.52 ccw(c5488.43,4589.62) 5501.23,4576.82 ccw(c5514.03,4564.02) U8.D16@5495.93,4564.02 ; 5495.31,4570.9 cw(c5508.11,4558.09) 5508.11,4576.2 ccw(c5508.11,4558.09) 5495.31,4570.9 ; 5495.31,4570.9 ccw(c5482.5,4583.7) 5500.61,4583.7 cw(c5482.5,4583.7) 5495.31,4570.9
  MidLayer1 w4: v3@5502.81,4589 ccw(c5490,4601.81) 5508.11,4601.81 ccw(c5526.22,4601.81) v3@5513.41,4589 ; v3@5502.92,4588.89 ccw(c5490.38,4601.43) 5508.11,4601.43 ccw(c5525.84,4601.43) v3@5513.3,4588.89 ; v3(5508.11,4583.7) 5508.11,4661.38 5508.11,4710 5508.11,4720 5508.11,4724.74 5508.11,4809.63 5606.86,4908.37 5606.86,4968.47 5646.76,5008.37 5918.17,5008.37 6009.84,5100.04 6526.5,5100.04 6543.17,5116.71 6659.84,5116.71 6726.5,5050.04 6834.84,5050.04 6869.17,5015.71 6917.17,5015.71 6934.84,5033.37 7090.19,5033.37 7139.69,4983.87 7265.69,4983.87 ; v1@7272.36,5000.02 cw(c7249.6,4999.97) 7265.69,4983.88 ; v1@7276.36,5000.03 cw(c7263.18,5000) 7272.5,4990.68 cw(c7281.81,4981.37) v1@7281.84,4994.54 ; v1@7281.84,4990.54 ccw(c7281.78,4967.78) 7265.69,4983.88 ; v1(7281.86,5000.04) 7265.69,4983.87
  Bottom Layer w4: v1(7281.86,5000.04) 7294.41,4987.49 ; U15.1@7289.37,4976.92 ccw(c7280.81,4987.49) 7294.41,4987.49 ; U15.1@7294.41,4970.71 7294.41,4987.49 ; U15.1@7299.45,4976.92 cw(c7308.01,4987.49) 7294.41,4987.49
DB_SRAM2.A1: U8.D18 U15.2 | length 2552.2
  Top Layer w4: U8.D18@5567.17,4564.02 v3(5586.85,4583.7) ; U8.D18@5567.17,4571.36 ccw(c5567.17,4589.08) 5579.7,4576.55 ccw(c5592.23,4564.02) U8.D18@5574.51,4564.02 ; U8.D18@5567.17,4571.52 ccw(c5567.17,4589.62) 5579.97,4576.82 ccw(c5592.77,4564.02) U8.D18@5574.67,4564.02 ; 5574.05,4570.9 cw(c5586.85,4558.09) 5586.85,4576.2 ccw(c5586.85,4558.09) 5574.05,4570.9 ; 5574.05,4570.9 ccw(c5561.24,4583.7) 5579.35,4583.7 cw(c5561.24,4583.7) 5574.05,4570.9
  MidLayer1 w4: v3@5581.55,4589 ccw(c5568.74,4601.81) 5586.85,4601.81 ccw(c5604.96,4601.81) v3@5592.15,4589 ; v3@5581.66,4588.89 ccw(c5569.12,4601.43) 5586.85,4601.43 ccw(c5604.58,4601.43) v3@5592.04,4588.89 ; v3(5586.85,4583.7) 5586.85,4661.38 5586.85,4710 5586.85,4720 5586.85,4724.74 5586.85,4767.89 5640.19,4821.22 5640.19,4841.71 5674.52,4876.04 5674.52,4920 5696.23,4941.71 5740.19,4941.71 v1(5761.52,4963.04) ; v1@5752.02,4963.04 cw(c5729.09,4963.04) 5745.31,4946.82 cw(c5761.52,4930.61) v1@5761.52,4953.54 ; v1@5756.02,4963.04 cw(c5742.75,4963.04) 5752.13,4953.65 cw(c5761.52,4944.26) v1@5761.52,4957.54
  Bottom Layer w4: v1(5761.52,4963.04) 5883.54,4963.04 6031.95,5111.44 6036.88,5116.37 6514.86,5116.37 6574.52,5176.04 6829.9,5176.04 6855.9,5150.04 6915.19,5150.04 6923.52,5141.71 7139.58,5141.71 7259.19,5022.1 7259.19,4946.21 7266.19,4939.21 U15.2@7294.41,4939.21 ; v1@5765.41,4959.15 cw(c5774.8,4949.76) 5774.8,4963.04 cw(c5774.8,4976.32) v1@5765.41,4966.93 ; v1@5768.24,4956.32 cw(c5784.46,4940.11) 5784.46,4963.04 cw(c5784.46,4985.98) v1@5768.24,4969.76
DB_SRAM2.A2: U8.A20 U15.3 | length 2581
  Top Layer w4: U8.A20@5640.6,4687.43 ccw(c5627.8,4700.23) 5645.91,4700.23 ccw(c5664.01,4700.23) U8.A20@5651.21,4687.43 ; U8.A20@5645.91,4682.13 5645.91,4710 5645.91,4720 5645.91,4747.94 5656.86,4758.89 5656.86,4768 5656.86,4839.23 5719.52,4901.9 5719.52,5026.71 5745,5052.18 5745,5135.85 5759.19,5150.04 v1(5799.86,5150.04) ; v1@5793.14,5143.32 ccw(c5776.92,5127.11) 5776.92,5150.04 ccw(c5776.92,5172.98) v1@5793.14,5156.76 ; v1@5795.97,5146.15 ccw(c5786.58,5136.76) 5786.58,5150.04 ccw(c5786.58,5163.32) v1@5795.97,5153.93 ; 5645.91,4699.85 ccw(c5663.63,4699.85) 5651.1,4687.32 cw(c5663.63,4699.85) 5645.91,4699.85 ; 5645.91,4699.85 cw(c5628.18,4699.85) 5640.71,4687.32 ccw(c5628.18,4699.85) 5645.91,4699.85
  MidLayer1 w4: v1(5799.86,5150.04) 5852.52,5202.71 6556.86,5202.71 6575.52,5184.04 7057.52,5184.04 v1(7240.19,5001.37) ; v1@5799.86,5155.54 ccw(c5799.86,5168.82) 5809.25,5159.43 ccw(c5818.64,5150.04) v1@5805.36,5150.04 ; v1@5799.86,5159.54 ccw(c5799.86,5182.48) 5816.07,5166.26 ccw(c5832.29,5150.04) v1@5809.36,5150.04 ; v1@7230.69,5001.37 ccw(c7207.76,5001.37) 7223.97,5017.59 ccw(c7240.19,5033.81) v1@7240.19,5010.87 ; v1@7234.69,5001.37 ccw(c7221.41,5001.37) 7230.8,5010.76 ccw(c7240.19,5020.15) v1@7240.19,5006.87
  Bottom Layer w4: v1@7233.47,4994.66 cw(c7217.26,4978.44) 7240.19,4978.44 cw(c7263.13,4978.44) v1@7246.91,4994.66 ; v1@7236.3,4997.49 cw(c7226.91,4988.1) 7240.19,4988.1 cw(c7253.47,4988.1) v1@7244.08,4997.49 ; v1(7240.19,5001.37) 7240.19,4924.72 7257.19,4907.72 U15.3@7294.41,4907.72 ; U15.3@7271.19,4902.06 ccw(c7257.54,4888.4) 7257.54,4907.72 ccw(c7257.54,4927.03) U15.3@7271.19,4913.37
DB_SRAM2.A3: U8.D20 U15.4 | length 2598.8
  Top Layer w4: U8.D20@5645.91,4564.02 v3(5665.59,4583.7) ; U8.D20@5645.91,4571.36 ccw(c5645.91,4589.08) 5658.44,4576.55 ccw(c5670.97,4564.02) U8.D20@5653.25,4564.02 ; U8.D20@5645.91,4571.52 ccw(c5645.91,4589.62) 5658.71,4576.82 ccw(c5671.51,4564.02) U8.D20@5653.41,4564.02 ; 5652.79,4570.9 cw(c5665.59,4558.09) 5665.59,4576.2 ccw(c5665.59,4558.09) 5652.79,4570.9 ; 5652.79,4570.9 ccw(c5639.98,4583.7) 5658.09,4583.7 cw(c5639.98,4583.7) 5652.79,4570.9
  MidLayer1 w4: v3@5660.4,4588.89 ccw(c5647.86,4601.43) 5665.59,4601.43 ccw(c5683.32,4601.43) v3@5670.78,4588.89 ; 5664,4819.97 5664,4747 5664.03,4726.3 5665.59,4724.74 5665.59,4720 5665.59,4710 5665.59,4661.38 v3(5665.59,4583.7) ; 5664.03,4820 5664.03,4838.57 5738.46,4913 5753.15,4913 5781.86,4941.71 v1(5840.19,4941.71) ; v1@5833.47,4934.99 ccw(c5817.26,4918.77) 5817.26,4941.71 ccw(c5817.26,4964.64) v1@5833.47,4948.43 ; v1@5836.3,4937.82 ccw(c5826.91,4928.43) 5826.91,4941.71 ccw(c5826.91,4954.99) v1@5836.3,4945.6 ; 5665.59,4601.81 cw(c5647.48,4601.81) 5660.29,4589 ccw(c5647.48,4601.81) 5665.59,4601.81 ; 5665.59,4601.81 ccw(c5683.7,4601.81) 5670.89,4589 cw(c5683.7,4601.81) 5665.59,4601.81
  Bottom Layer w4: v1(5840.19,4941.71) 5873.52,4941.71 6040.19,5108.37 6518.17,5108.37 6577.84,5168.04 6826.58,5168.04 6852.92,5141.71 6912.21,5141.71 6920.54,5133.37 7136.6,5133.37 7220,5049.98 7220,4903.74 7247.52,4876.22 U15.4@7294.41,4876.22 ; v1@5844.08,4937.82 cw(c5853.47,4928.43) 5853.47,4941.71 cw(c5853.47,4954.99) v1@5844.08,4945.6 ; v1@5846.91,4934.99 cw(c5863.13,4918.77) 5863.13,4941.71 cw(c5863.13,4964.64) v1@5846.91,4948.43 ; U15.4@7271.19,4870.56 ccw(c7257.54,4856.9) 7257.54,4876.22 ccw(c7257.54,4895.53) U15.4@7271.19,4881.88